# Altium PCB Commodore CPM Modul.PcbDoc (part 1 of 2)
Units mm, origin at the board's own origin, x right, y up, seen from the top; angles counter-clockwise.
Board outline 105.5 x 129.25 mm, 2 copper layers (Top Layer, Bottom Layer), stack 1.569 mm thick; 51 components, 93 nets, 364 pads, 127 vias.
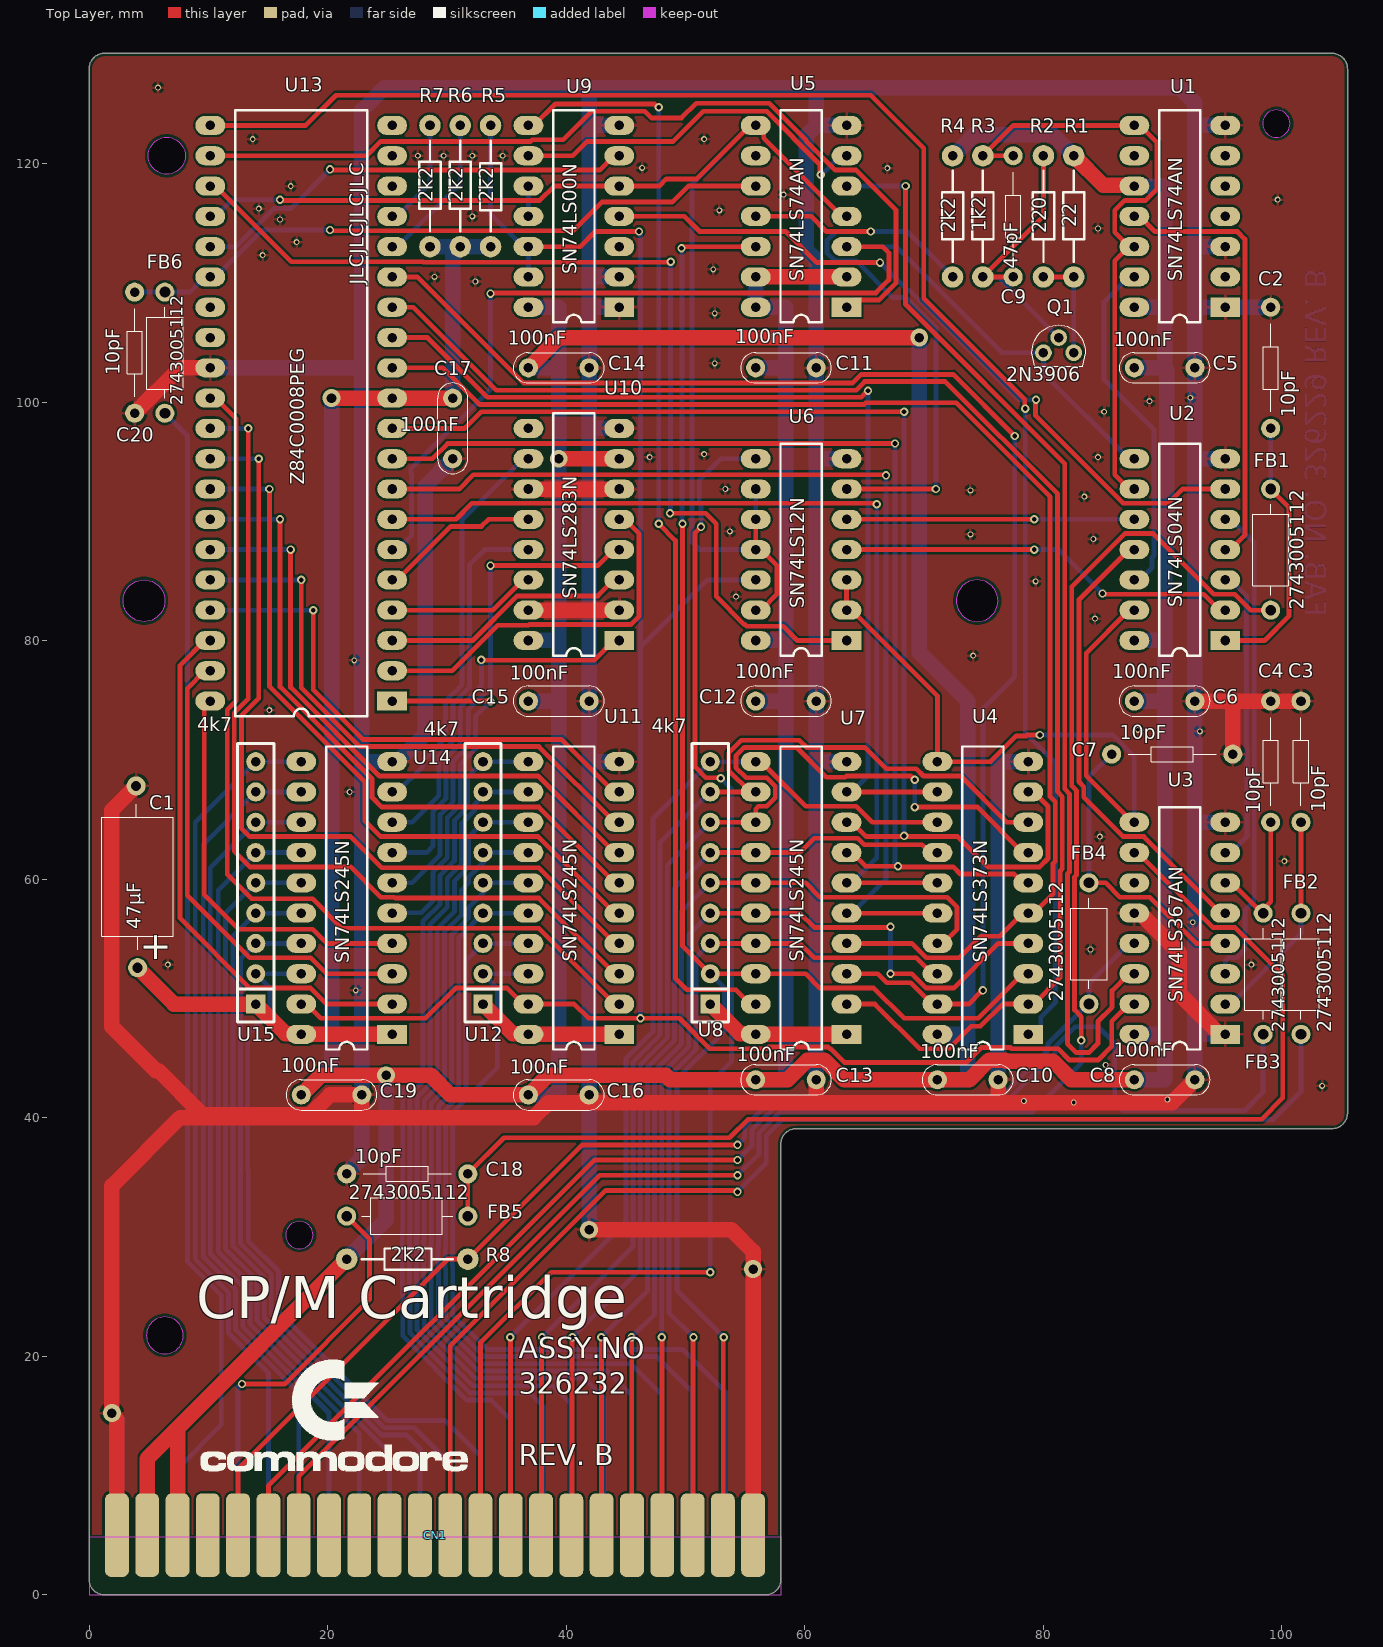
[diagram p0: Top Layer view]
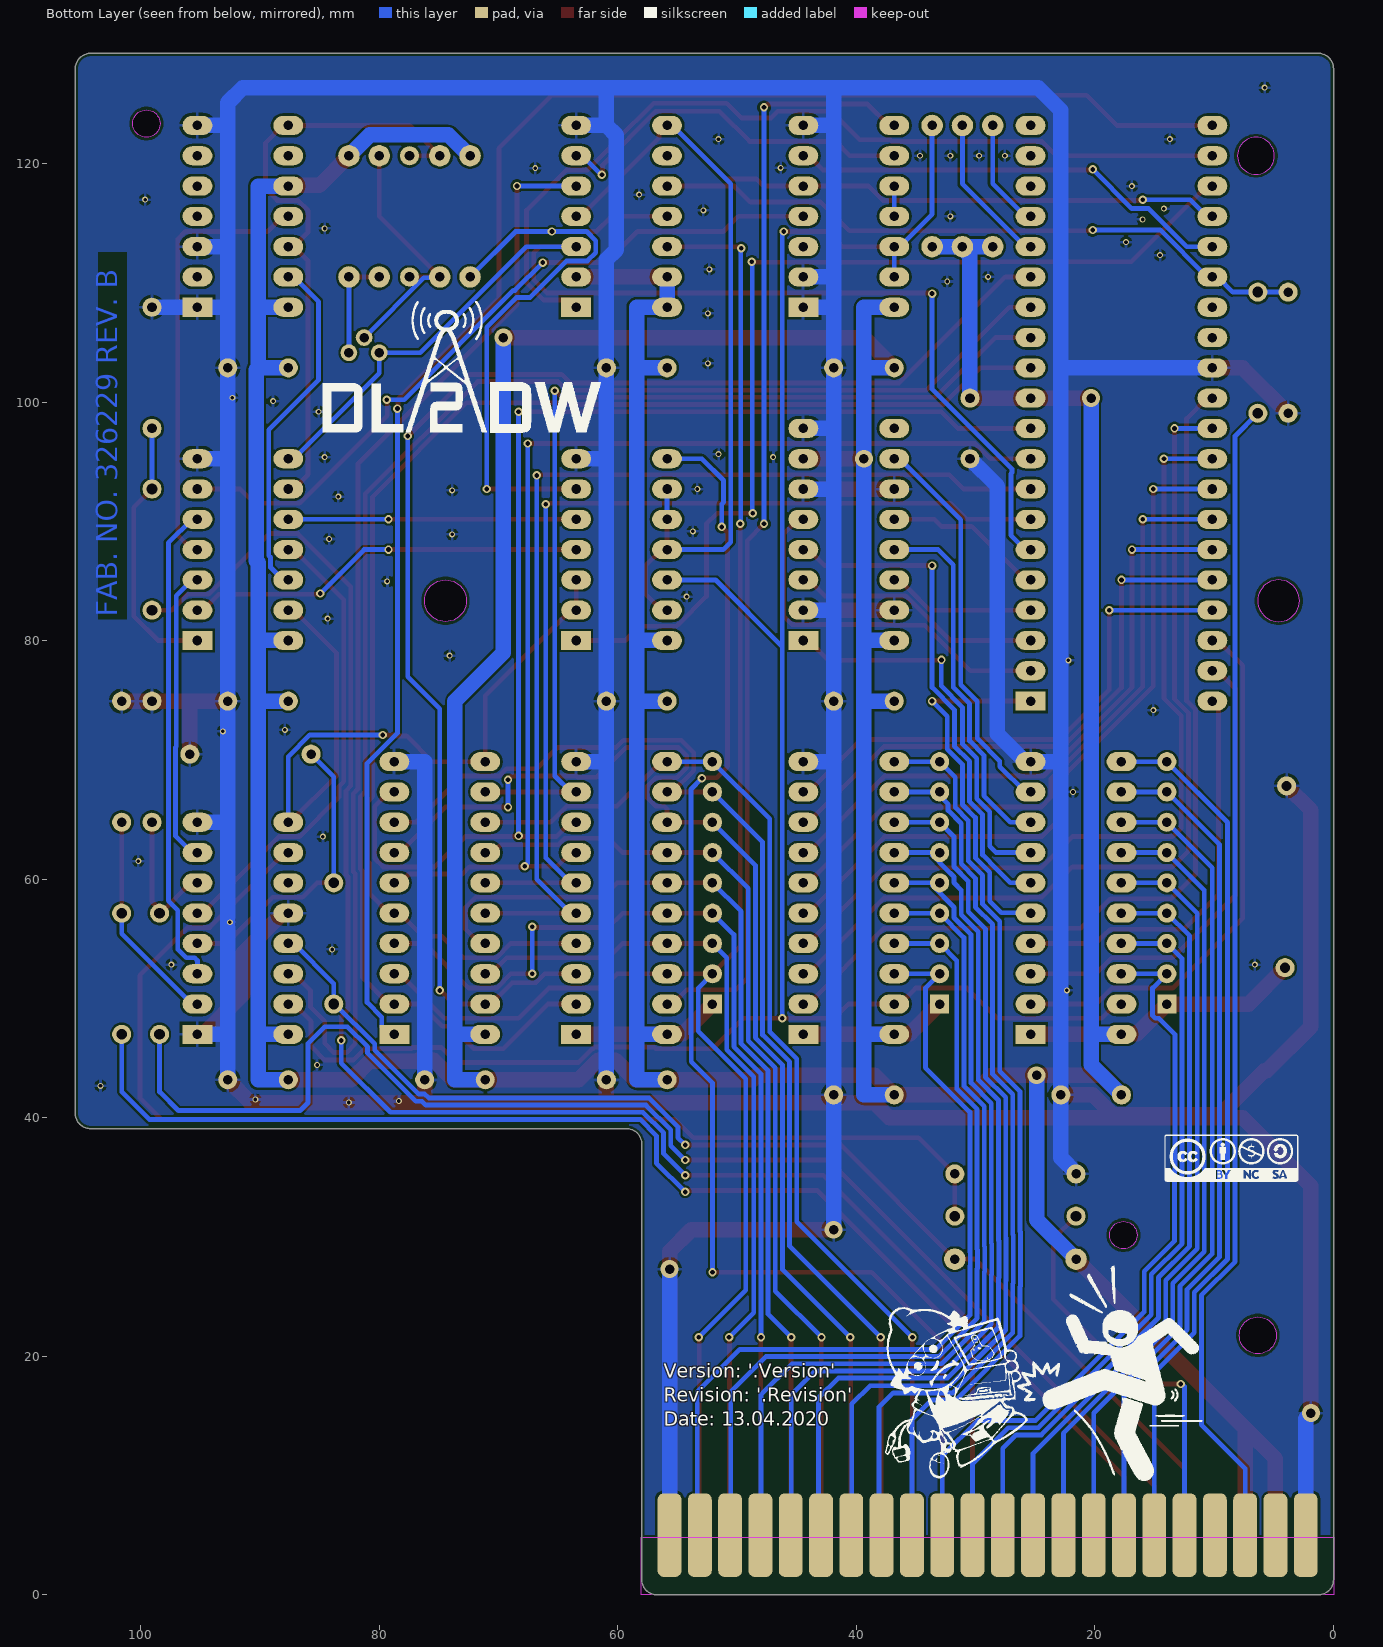
[diagram p1: Bottom Layer view, seen from below]
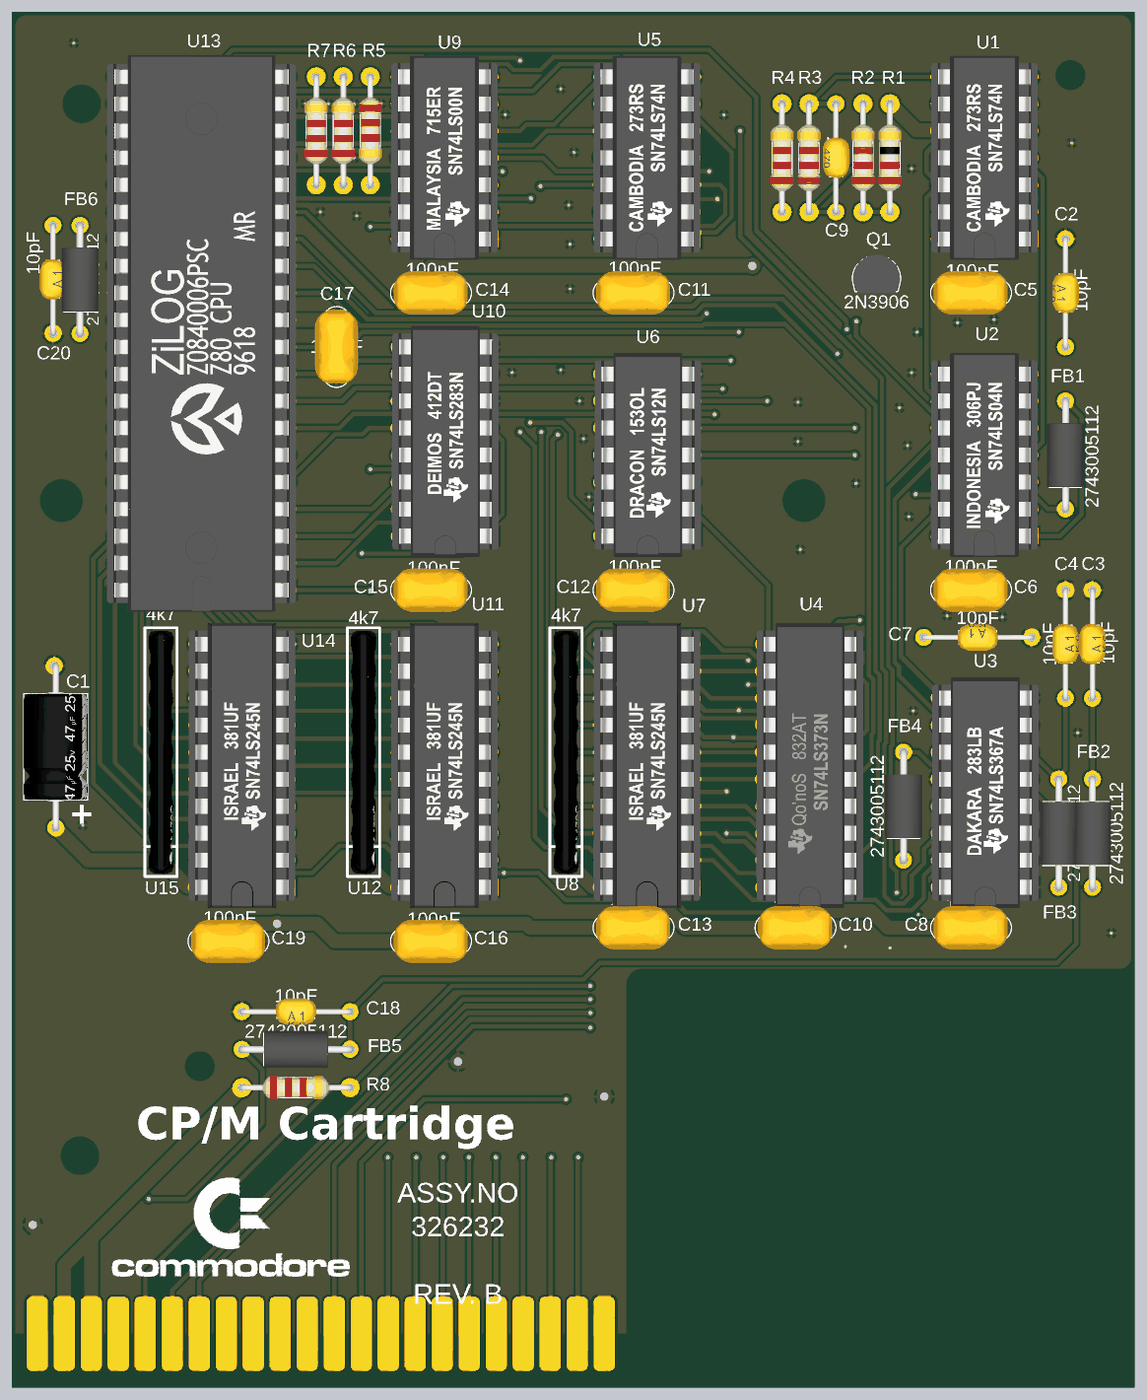
[diagram p3: 3D render of the assembled board from above, using the file's embedded part models]

## Layer stack, top to bottom
Top Solder: solder mask 0.0254, SM-001, Dk 4
Top Layer: signal copper 0.035
Dielectric 1: core 1.4986, Core-043, Dk 4.3
Bottom Layer: signal copper 0.035
Bottom Solder: solder mask 0.0254, SM-001, Dk 4

## Board outline
0,1.27 ccw(c1.27,1.27) 1.27,0 56.728,0 ccw(c56.728,1.27) 57.998,1.27 57.998,37.809 cw(c59.269,37.809) 59.269,39.08 104.202,39.08 ccw(c104.202,40.378) 105.5,40.378 105.5,127.926 ccw(c104.176,127.926) 104.176,129.25 1.306,129.25 ccw(c1.306,127.944) 0,127.944
cut-out: 16.469,30.16 ccw(c17.619,30.16) 17.619,29.01 ccw(c17.619,30.16) 18.769,30.16 ccw(c17.619,30.16) 17.619,31.31 ccw(c17.619,30.16)
cut-out: 4.797,21.748 ccw(c6.347,21.748) 6.347,20.198 ccw(c6.347,21.748) 7.897,21.748 ccw(c6.347,21.748) 6.347,23.298 ccw(c6.347,21.748)
cut-out: 6.506,119.1 cw(c6.506,120.65) 4.956,120.65 cw(c6.506,120.65) 6.506,122.2 cw(c6.506,120.65) 8.056,120.65 cw(c6.506,120.65)
cut-out: 98.38,123.349 ccw(c99.53,123.349) 99.53,122.199 ccw(c99.53,123.349) 100.68,123.349 ccw(c99.53,123.349) 99.53,124.499 ccw(c99.53,123.349)
cut-out: 4.601,81.594 cw(c4.601,83.344) 2.851,83.344 cw(c4.601,83.344) 4.601,85.094 cw(c4.601,83.344) 6.351,83.344 cw(c4.601,83.344)
cut-out: 72.701,83.344 ccw(c74.451,83.344) 74.451,81.594 ccw(c74.451,83.344) 76.201,83.344 ccw(c74.451,83.344) 74.451,85.094 ccw(c74.451,83.344)

## Design rules (kind name [scope] priority, off if disabled: settings)
BoardOutlineClearance [All] p1: gap=0.254 ignorepadtopadclearanceinfootprint=FALSE except(0: Region-OutlineEdge)
Clearance [All] p1: gap=0.2 ignorepadtopadclearanceinfootprint=TRUE
ComponentClearance ComponentClearance_Sheet [HasFootprint('PCB Title Block DIN A4')] p1: gap=0 collisioncheckmode=3 verticalgap=0 showdistances=FALSE
ComponentClearance [All] p2: gap=0 collisioncheckmode=3 verticalgap=0 showdistances=FALSE
MinimumSolderMaskSliver [All] p1: minsoldermaskwidth=0.103
PolygonConnect [All] p1: connectstyle=Relief reliefconductorwidth=0.254 reliefentries=4 polygonreliefangle="90 Angle" airgapwidth=0.254
RoutingVias RoutingVias_Power [(InNet('VCC') OR InNet('GND') OR InNet('+5V'))] p1: holewidth=0.8 width=1.5 viastyle="Through Hole" minholewidth=0.5 minwidth=1 maxholewidth=0.8 maxwidth=1.5
RoutingVias [All] p2: holewidth=0.4 width=0.7 viastyle="Through Hole" minholewidth=0.3 minwidth=0.6 maxholewidth=0.5 maxwidth=0.8
SilkToSilkClearance [All] p1: silktosilkclearance=0
SilkToSolderMaskClearance [IsPad] p1: minsilkscreentomaskgap=0.2 clearancetoexposedcopper=TRUE
SolderMaskExpansion [All] p1: expansion=0.038 istentingtop=FALSE
UnRoutedNet [All] p1: checkbadconnections=TRUE
Width Width_Power [(InNet('VCC') OR InNet('GND') OR InNet('+5V'))] p1: maxlimit=1.5 minlimit=1 preferedwidth=1.3
Width [All] p2: maxlimit=0.6 minlimit=0.3 preferedwidth=0.4
25 further rules are at their usual default settings.

## Classes and differential pairs
net class L_D[0..7]: L_D0 L_D1 L_D2 L_D3 L_D4 L_D5 L_D6 L_D7
net class L_A[0..15]: L_A0 L_A1 L_A2 L_A3 L_A4 L_A5 L_A6 L_A7 L_A8 L_A9 L_A10 L_A11 L_A12 L_A13 L_A14 L_A15
net class D[0..7]: D0 D1 D2 D3 D4 D5 D6 D7
net class A[0..15]: A0 A1 A2 A3 A4 A5 A6 A7 A8 A9 A10 A11 A12 A13 A14 A15

## Components (designator, comment, footprint, x,y, rotation, side; value= is the part's Value field where it differs from the comment)
C1 "47µF" "CAP Elec 47uF 25V Axial - Vishay MAL203036479E3" 4.064,52.578 r90 top
C2 "10pF" "CAP CER 10PF 50V C0G/NP0 AXIAL Vishay A100J15C0GF5TAA" 99.06,107.95 r270 top locked
C3 "10pF" "CAP CER 10PF 50V C0G/NP0 AXIAL Vishay A100J15C0GF5TAA" 101.6,64.77 r90 top locked
C4 "10pF" "CAP CER 10PF 50V C0G/NP0 AXIAL Vishay A100J15C0GF5TAA" 99.06,64.77 r90 top locked
C5 "100nF" "CAP CER 0.1UF 50V X7R RADIAL Kemet C330C104J5R5TA" 92.71,102.87 r180 top locked
C6 "100nF" "CAP CER 0.1UF 50V X7R RADIAL Kemet C330C104J5R5TA" 92.71,74.93 r180 top locked
C7 "10pF" "CAP CER 10PF 50V C0G/NP0 AXIAL Vishay A100J15C0GF5TAA" 95.885,70.485 r180 top locked
C8 "100nF" "CAP CER 0.1UF 50V X7R RADIAL Kemet C330C104J5R5TA" 92.71,43.18 r180 top locked
C9 "47pF" "CAP CER 47PF 50V C0G/NP0 AXIAL Vishay A470J15C0GF5TAA" 77.47,120.65 r270 top locked
C10 "100nF" "CAP CER 0.1UF 50V X7R RADIAL Kemet C330C104J5R5TA" 76.2,43.18 r180 top locked
C11 "100nF" "CAP CER 0.1UF 50V X7R RADIAL Kemet C330C104J5R5TA" 60.96,102.87 r180 top locked
C12 "100nF" "CAP CER 0.1UF 50V X7R RADIAL Kemet C330C104J5R5TA" 60.96,74.93 r180 top locked
C13 "100nF" "CAP CER 0.1UF 50V X7R RADIAL Kemet C330C104J5R5TA" 60.96,43.18 r180 top locked
C14 "100nF" "CAP CER 0.1UF 50V X7R RADIAL Kemet C330C104J5R5TA" 41.91,102.87 r180 top locked
C15 "100nF" "CAP CER 0.1UF 50V X7R RADIAL Kemet C330C104J5R5TA" 41.91,74.93 r180 top locked
C16 "100nF" "CAP CER 0.1UF 50V X7R RADIAL Kemet C330C104J5R5TA" 41.91,41.91 r180 top locked
C17 "100nF" "CAP CER 0.1UF 50V X7R RADIAL Kemet C330C104J5R5TA" 30.48,95.25 r90 top locked
C18 "10pF" "CAP CER 10PF 50V C0G/NP0 AXIAL Vishay A100J15C0GF5TAA" 21.59,35.288 r0 top locked
C19 "100nF" "CAP CER 0.1UF 50V X7R RADIAL Kemet C330C104J5R5TA" 22.86,41.91 r180 top locked
C20 "10pF" "CAP CER 10PF 50V C0G/NP0 AXIAL Vishay A100J15C0GF5TAA" 3.81,99.06 r90 top locked
CN1 "Expansion Port EDGE Connector" "C64 Expansion Port EDGE Connector" 2.329,5 r0 top locked
FB1 "2743005112" "Ferrite Bead Fair Rite 2743005112 axial 10,16mm" 99.06,82.55 r90 top locked
FB2 "2743005112" "Ferrite Bead Fair Rite 2743005112 axial 10,16mm" 101.6,46.99 r90 top locked
FB3 "2743005112" "Ferrite Bead Fair Rite 2743005112 axial 10,16mm" 98.425,46.99 r90 top locked
FB4 "2743005112" "Ferrite Bead Fair Rite 2743005112 axial 10,16mm" 83.82,49.53 r90 top locked
FB5 "2743005112" "Ferrite Bead Fair Rite 2743005112 axial 10,16mm" 21.59,31.75 r0 top locked
FB6 "2743005112" "Ferrite Bead Fair Rite 2743005112 axial 10,16mm" 6.35,99.06 r90 top locked
Q1 "2N3906" 2N3906 80.01,104.14 r0 top locked
R1 "22" "22 Ohm R Axial DIN0207 L6.3mm D2.5mm P10.16mm Horizontal" 82.55,110.49 r90 top locked
R2 "220" "220 Ohm R Axial DIN0207 L6.3mm D2.5mm P10.16mm Horizontal" 80.01,110.49 r90 top locked
R3 "1k2" "1,2 kOhm R Axial DIN0207 L6.3mm D2.5mm P10.16mm Horizontal" 74.93,110.49 r90 top locked
R4 "2k2" "2,2 kOhm R Axial DIN0207 L6.3mm D2.5mm P10.16mm Horizontal" 72.39,110.49 r90 top locked
R5 "2k2" "2,2 kOhm R Axial DIN0207 L6.3mm D2.5mm P10.16mm Horizontal" 33.655,123.19 r270 top locked
R6 "2k2" "2,2 kOhm R Axial DIN0207 L6.3mm D2.5mm P10.16mm Horizontal" 31.115,113.03 r90 top locked
R7 "2k2" "2,2 kOhm R Axial DIN0207 L6.3mm D2.5mm P10.16mm Horizontal" 28.575,113.03 r90 top locked
R8 "2k2" "2,2 kOhm R Axial DIN0207 L6.3mm D2.5mm P10.16mm Horizontal" 21.59,28.144 r0 top locked
U1 "SN74LS74AN" "SN74LS74N with Socket" 95.25,107.95 r180 top locked
U2 "SN74LS04N" "SN74LS04N with Socket" 95.25,80.01 r90 top locked
U3 "SN74LS367AN" "SN74LS367A with Socket" 95.25,46.99 r180 top locked
U4 "SN74LS373N" "SN74LS373N with Socket" 78.74,46.99 r180 top locked
U5 "SN74LS74AN" "SN74LS74N with Socket" 63.5,107.95 r180 top locked
U6 "SN74LS12N" "SN74LS12N with Socket" 63.5,80.01 r180 top locked
U7 "SN74LS245N" "SN74LS245N with Socket" 63.5,46.99 r180 top locked
U8 "4k7" "4k7 x8 Resistor Array SIL Royal 9A472G" 52.07,49.53 r90 top locked
U9 "SN74LS00N" "SN74LS00N with Socket" 44.45,107.95 r90 top locked
U10 "SN74LS283N" "SN74LS283N with Socket" 44.45,80.01 r180 top locked
U11 "SN74LS245N" "SN74LS245N with Socket" 44.45,46.99 r180 top locked
U12 "4k7" "4k7 x8 Resistor Array SIL Royal 9A472G" 33.02,49.53 r90 top locked
U13 "Z84C0008PEG" "Zilog Z80 CPU with Socket" 25.4,74.93 r180 top locked
U14 "SN74LS245N" "SN74LS245N with Socket" 25.4,46.99 r180 top locked
U15 "4k7" "4k7 x8 Resistor Array SIL Royal 9A472G" 13.97,49.53 r90 top locked

## Footprints (in the part's own frame and the unit in brackets; to place one, negate y for a bottom-side part, rotate by r counter-clockwise, add the part's x,y. Pads: shape width x height; smd on the part's side, far side on the other; paste and mask are expansions set on the pad)
"1,2 kOhm R Axial DIN0207 L6.3mm D2.5mm P10.16mm Horizontal" [mm]
  round 1.8 hole 0.8: 1(0,0) 2(10.16,0)
  silkscreen extent 1.27,-0.89 8.89,0.89, body extent -0.27,-1.14 10.44,1.14, height 2.44
"2,2 kOhm R Axial DIN0207 L6.3mm D2.5mm P10.16mm Horizontal" [mm]
  round 1.8 hole 0.8: 1(0,0) 2(10.16,0)
  silkscreen extent 1.27,-0.89 8.89,0.89, body extent -0.27,-1.14 10.44,1.14, height 2.44
2N3906 [mm] "PNP General Purpose  Transistors"
  round 1.4 hole 0.8: 1(0,0) 2(1.27,1.27) 3(2.54,0)
  silkscreen extent -1.02,-1.14 3.56,2.29, body extent -0.97,-1.34 3.51,2.35, height 7.52
"4k7 x8 Resistor Array SIL Royal 9A472G" [mm]
  rect 1.6x1.6 hole 0.8: 1(0,0)
  round 1.6 hole 0.8: 2(2.54,0) 3(5.08,0) 4(7.62,0) 5(10.16,0) 6(12.7,0) 7(15.24,0) 8(17.78,0) 9(20.32,0)
  silkscreen extent -1.52,-1.52 21.84,1.52, body extent -1.27,-1.21 21.59,1.21, height 5.03
"22 Ohm R Axial DIN0207 L6.3mm D2.5mm P10.16mm Horizontal" [mm]
  round 1.8 hole 0.8: 1(0,0) 2(10.16,0)
  silkscreen extent 1.27,-0.89 8.89,0.89, body extent -0.27,-1.14 10.44,1.14, height 2.44
"220 Ohm R Axial DIN0207 L6.3mm D2.5mm P10.16mm Horizontal" [mm]
  round 1.8 hole 0.8: 1(0,0) 2(10.16,0)
  silkscreen extent 1.27,-0.89 8.89,0.89, body extent -0.27,-1.14 10.44,1.14, height 2.44
"C64 Expansion Port EDGE Connector" [mm] "C64 Expansion Port EDGE Connector"
  rrect50% 2x7 smd paste-1: 1(0,0) 2(2.54,0) 3(5.08,0) 4(7.62,0) 5(10.16,0) 6(12.7,0) 7(15.24,0) 8(17.78,0) 9(20.32,0) 10(22.86,0) 11(25.4,0) 12(27.94,0) 13(30.48,0) 14(33.02,0) 15(35.56,0) 16(38.1,0) 17(40.64,0) 18(43.18,0) 19(45.72,0) 20(48.26,0) 21(50.8,0) 22(53.34,0)
  rrect50% 2x7 smd far side paste-1: A(0,0) B(2.54,0) C(5.08,0) D(7.62,0) E(10.16,0) F(12.7,0) H(15.24,0) J(17.78,0) K(20.32,0) L(22.86,0) M(25.4,0) N(27.94,0) P(30.48,0) R(33.02,0) S(35.56,0) T(38.1,0) U(40.64,0) V(43.18,0) W(45.72,0) X(48.26,0) Y(50.8,0) Z(53.34,0)
"CAP CER 0.1UF 50V X7R RADIAL Kemet C330C104J5R5TA" [mm] "0,1µF ±5% 50V Keramikkondensatoren X7R Radial"
  round 1.6 hole 0.8: 1(0,0) 2(5.08,0)
  silkscreen extent -1.27,-1.27 6.35,1.27, body extent -0.91,-2.04 6.06,2.03, height 10.26
"CAP CER 10PF 50V C0G/NP0 AXIAL Vishay A100J15C0GF5TAA" [mm] "10pF ±5% 50V Keramikkondensatoren C0G, NP0 Axial"
  round 1.6 hole 0.8: 1(0,0) 2(10.16,0)
  silkscreen extent 1.4,-0.63 8.76,0.64, body extent -0.25,-1.25 10.41,1.25, height 2.55
"CAP CER 47PF 50V C0G/NP0 AXIAL Vishay A470J15C0GF5TAA" [mm] "47pF ±5% 50V Keramikkondensatoren C0G, NP0 Axial"
  round 1.6 hole 0.8: 1(0,0) 2(10.16,0)
  silkscreen extent 1.4,-0.63 8.76,0.64, body extent -0.25,-1.25 10.41,1.25, height 2.55
"CAP Elec 47uF 25V Axial - Vishay MAL203036479E3" [mm] "Aluminium Electrolytic Capacitors - Axial Leaded 47uF 25V -10%,+50% Axial"
  round 1.6 hole 0.85: 1(0,0) 2(15.24,0.127)
  silkscreen extent 1.52,-3 13.72,3, body extent -0.3,-3 15.54,3, height 6.1
"Ferrite Bead Fair Rite 2743005112 axial 10,16mm" [mm] "FERRITE BEAD AXIAL 1LN"
  round 1.6 hole 0.9: 1(0,0) 2(10.16,0)
  silkscreen extent 1.27,-1.52 8.89,1.52, body extent -0.33,-1.75 10.48,1.75, height 3.75
"SN74LS00N with Socket" [mm]
  rect 1.6x2.5 hole 0.8: 1(0,0)
  oval 1.6x2.5 hole 0.8: 2(2.54,0) 3(5.08,0) 4(7.62,0) 5(10.16,0) 6(12.7,0) 7(15.24,0) 8(15.24,7.62) 9(12.7,7.62) 10(10.16,7.62) 11(7.62,7.62) 12(5.08,7.62) 13(2.54,7.62) 14(0,7.62)
  silkscreen extent -1.27,2.08 16.51,5.54, body extent -1.97,-1.19 17.21,8.86, height 7.91
"SN74LS04N with Socket" [mm]
  rect 1.6x2.5 hole 0.8: 1(0,0)
  oval 1.6x2.5 hole 0.8: 2(2.54,0) 3(5.08,0) 4(7.62,0) 5(10.16,0) 6(12.7,0) 7(15.24,0) 8(15.24,7.62) 9(12.7,7.62) 10(10.16,7.62) 11(7.62,7.62) 12(5.08,7.62) 13(2.54,7.62) 14(0,7.62)
  silkscreen extent -1.27,2.08 16.51,5.54, body extent -1.97,-1.19 17.21,8.86, height 7.91
"SN74LS12N with Socket" [mm] "triple 3-input NAND gate"
  rect 2.5x1.6 hole 0.8: 1(0,0)
  oval 2.5x1.6 hole 0.8: 2(0,-2.54) 3(0,-5.08) 4(0,-7.62) 5(0,-10.16) 6(0,-12.7) 7(0,-15.24) 8(7.62,-15.24) 9(7.62,-12.7) 10(7.62,-10.16) 11(7.62,-7.62) 12(7.62,-5.08) 13(7.62,-2.54) 14(7.62,0)
  silkscreen extent 2.08,-16.51 5.54,1.27, body extent -1.27,-17.21 8.78,1.97, height 8.01
"SN74LS74N with Socket" [mm]
  rect 2.5x1.6 hole 0.8: 1(0,0)
  oval 2.5x1.6 hole 0.8: 2(0,-2.54) 3(0,-5.08) 4(0,-7.62) 5(0,-10.16) 6(0,-12.7) 7(0,-15.24) 8(7.62,-15.24) 9(7.62,-12.7) 10(7.62,-10.16) 11(7.62,-7.62) 12(7.62,-5.08) 13(7.62,-2.54) 14(7.62,0)
  silkscreen extent 2.08,-16.51 5.54,1.27, body extent -1.19,-17.21 8.86,1.97, height 7.91
"SN74LS245N with Socket" [mm]
  rect 2.5x1.6 hole 0.8: 1(0,0)
  oval 2.5x1.6 hole 0.8: 2(0,-2.54) 3(0,-5.08) 4(0,-7.62) 5(0,-10.16) 6(0,-12.7) 7(0,-15.24) 8(0,-17.78) 9(0,-20.32) 10(0,-22.86) 11(7.62,-22.86) 12(7.62,-20.32) 13(7.62,-17.78) 14(7.62,-15.24) 15(7.62,-12.7) 16(7.62,-10.16) 17(7.62,-7.62) 18(7.62,-5.08) 19(7.62,-2.54) 20(7.62,0)
  silkscreen extent 2.08,-24.13 5.54,1.27, body extent -1.19,-24.83 8.86,1.97, height 7.91
"SN74LS283N with Socket" [mm] "4-bit binary full adder (has carry in function)"
  rect 2.5x1.6 hole 0.8: 1(0,0)
  oval 2.5x1.6 hole 0.8: 2(0,-2.54) 3(0,-5.08) 4(0,-7.62) 5(0,-10.16) 6(0,-12.7) 7(0,-15.24) 8(0,-17.78) 9(7.62,-17.78) 10(7.62,-15.24) 11(7.62,-12.7) 12(7.62,-10.16) 13(7.62,-7.62) 14(7.62,-5.08) 15(7.62,-2.54) 16(7.62,0)
  silkscreen extent 2.08,-19.05 5.54,1.27, body extent -1.27,-19.75 8.78,1.97, height 8.01
"SN74LS367A with Socket" [mm] "hex buffer, non-inverting outputs"
  rect 2.5x1.6 hole 0.8: 1(0,0)
  oval 2.5x1.6 hole 0.8: 2(0,-2.54) 3(0,-5.08) 4(0,-7.62) 5(0,-10.16) 6(0,-12.7) 7(0,-15.24) 8(0,-17.78) 9(7.62,-17.78) 10(7.62,-15.24) 11(7.62,-12.7) 12(7.62,-10.16) 13(7.62,-7.62) 14(7.62,-5.08) 15(7.62,-2.54) 16(7.62,0)
  silkscreen extent 2.08,-19.05 5.54,1.27, body extent -1.27,-19.75 8.78,1.97, height 8.01
"SN74LS373N with Socket" [mm] "OCTAL D-TYPE TRANSPARENT LATCHES AND EDGE-TRIGGERED FLIP-FLOPS"
  rect 2.5x1.6 hole 0.8: 1(0,0)
  oval 2.5x1.6 hole 0.8: 2(0,-2.54) 3(0,-5.08) 4(0,-7.62) 5(0,-10.16) 6(0,-12.7) 7(0,-15.24) 8(0,-17.78) 9(0,-20.32) 10(0,-22.86) 11(7.62,-22.86) 12(7.62,-20.32) 13(7.62,-17.78) 14(7.62,-15.24) 15(7.62,-12.7) 16(7.62,-10.16) 17(7.62,-7.62) 18(7.62,-5.08) 19(7.62,-2.54) 20(7.62,0)
  silkscreen extent 2.08,-24.13 5.54,1.27, body extent -1.27,-24.83 8.78,1.97, height 8.01
"Zilog Z80 CPU with Socket" [mm]
  rect 2.5x1.6 hole 0.8: 1(0,0)
  oval 2.5x1.6 hole 0.8: 2(0,-2.54) 3(0,-5.08) 4(0,-7.62) 5(0,-10.16) 6(0,-12.7) 7(0,-15.24) 8(0,-17.78) 9(0,-20.32) 10(0,-22.86) 11(0,-25.4) 12(0,-27.94) 13(0,-30.48) 14(0,-33.02) 15(0,-35.56) 16(0,-38.1) 17(0,-40.64) 18(0,-43.18) 19(0,-45.72) 20(0,-48.26) 21(15.24,-48.26) 22(15.24,-45.72) 23(15.24,-43.18) 24(15.24,-40.64) 25(15.24,-38.1) 26(15.24,-35.56) 27(15.24,-33.02) 28(15.24,-30.48) 29(15.24,-27.94) 30(15.24,-25.4) 31(15.24,-22.86) 32(15.24,-20.32) 33(15.24,-17.78) 34(15.24,-15.24) 35(15.24,-12.7) 36(15.24,-10.16) 37(15.24,-7.62) 38(15.24,-5.08) 39(15.24,-2.54) 40(15.24,0)
  silkscreen extent 2.08,-49.53 13.16,1.27, body extent -1.27,-50.3 16.51,2.04, height 8.89

## Part data
C1: library part CMP-Capacitors-Electrolyt_Capacitors00023-1, "Cap Aluminum 47uF 25V -10% to 50% (6 X 10mm) Axial 4.8 Ohm 100mA 3000 hr 85C Taped in Box", Capacitance=47uF, Case/Package=Axial, ESR (Equivalent Series Resistance)=4.8R, Leakage Current=12uA, Max Operating Temperature=85°C, Min Operating Temperature=-40°C, Package Quantity=1000, Ripple Current=100mA, Tolerance=50%, Voltage=25V, Construction=AXIAL, Diameter=6mm, Height=10mm, Impedance=1.9R, Lead Diameter=0.6mm, Lead Pitch=15mm, Length=10mm, Life (Hours)=3000Hour, Mount="Through Hole", Packaging="Tape and Reel", Polarity=Polar, Radiation Hardening=No, REACH SVHC=Unknown, RoHS Compliant=Yes, Series="030 AS", Termination=Axial, Voltage Rating=25V, Voltage Rating (DC)=25V
C2 C3 C4 C7 C18 C20: library part CMP-Capacitors-Ceramic_Capacitors-00047-1, "Cap Ceramic 10pF 50V C0G 5% Axial 125C T/R", Case/Package=Axial, Dielectric=C0G, Max Operating Temperature=125°C, Min Operating Temperature=-55°C, Package Quantity=7000, Tolerance=5%, Voltage Rating=50V, Capacitance=10pF, Construction=AXIAL, Length=0.15inch, Mount="Through Hole", Packaging="Tape and Reel", Radiation Hardening=No, RoHS Compliant=Yes, Series=A, Termination=Axial
C5 C6 C8 C10 C11 C12 C13 C14 C15 C16 C17 C19: library part CMP-Capacitors-Ceramic_Capacitors-00046-1, "Cap Ceramic 0.1uF 50V X7R 5% Radial 5.08mm 125C Bulk", Case/Package=Dipped, Dielectric=X7R, Max Operating Temperature=125°C, Min Operating Temperature=-55°C, Tolerance=5%, Capacitance=100nF, Construction=RADIAL, Depth=3.81mm, Lead Pitch=5.08mm, Length=7.62mm, Mount="Through Hole", Packaging=Bulk, Radiation Hardening=No, RoHS Compliant=Yes, Termination=Radial
C9: library part CMP-Capacitors-Ceramic_Capacitors-00048-1, "Cap Ceramic 47pF 50V C0G 5% Axial 125C T/R", Case/Package=Axial, Dielectric=C0G, Max Operating Temperature=125°C, Min Operating Temperature=-55°C, Package Quantity=7000, Tolerance=5%, Voltage Rating=50V, Capacitance=47pF, Construction=AXIAL, Length=0.15inch, Mount="Through Hole", Packaging="Tape and Reel", Radiation Hardening=No, RoHS Compliant=Yes, Series=A, Termination=Axial
CN1: library part CMP-Commodore-00008-4, "Expansion Port EDGE Connector for Interface Cards"
FB1 FB2 FB3 FB4 FB5 FB6: library part CMP-Inductors-00000-10, "Ferrite Beads Axial 91Ohm 100MHz T/R", Case/Package=Axial, Max Operating Temperature=125°C, Min Operating Temperature=-55°C, Package Quantity=4500, Test Frequency=100MHz, Diameter=3.5mm, Impedance=91R, Length=6mm, Packaging="Tape and Reel", Shielding=Unshielded, Termination=Axial
Q1: library part CMP-Transistors-00014-1, "Bipolar Transistor PNP Amplifier/Switch 40V 200mA 3-Pin TO-92 Through Hole Box", Case/Package=TO-92, Collector Base Voltage (VCBO)=40V, Collector Emitter Saturation Voltage=400mV, Continuous Collector Current=200mA, Emitter Base Voltage (VEBO)=5V, Max Collector Current=50nA, Max Power Dissipation=625mW, Package Quantity=2500, Transition Frequency=250MHz, Collector Emitter Breakdown Voltage=40V, Collector Emitter Voltage (VCEO)=40V, Collector-emitter Voltage-Max=40V, Element Configuration=Single, Gain Bandwidth Product=250MHz, hFE Min=100, Lead Free="Lead Free", Mount="Through Hole", Packaging=Bulk, Polarity=PNP, RoHS Compliant=Yes, Series=-
R1: library part CMP-Resistors-Yageo_THT_DIN_0207-00032-1, "RES 22 OHM 1/4W 5% AXIAL", Case/Package=Axial, Max Operating Temperature=155°C, Max Power Dissipation=250mW, Min Operating Temperature=-55°C, Package Quantity=200, Resistance=22R, Temperature Coefficient=500ppm/°C, Tolerance=5%, Composition="Carbon Film", Length=0.248inch, Number of Terminations=2, Packaging=Bulk
R2: library part CMP-Resistors-Yageo_THT_DIN_0207-00056-1, "RES 220 OHM 1/4W 5% AXIAL", Case/Package=Axial, Max Operating Temperature=155°C, Max Power Dissipation=250mW, Min Operating Temperature=-55°C, Package Quantity=200, Resistance=220R, Temperature Coefficient=500ppm/°C, Tolerance=5%, Composition="Carbon Film", Length=0.248inch, Number of Terminations=2, Packaging=Bulk
R3: library part CMP-Resistors-Yageo_THT_DIN_0207-00074-1, "RES 1.2K OHM 1/4W 5% AXIAL", Case/Package=Axial, Max Operating Temperature=155°C, Max Power Dissipation=250mW, Min Operating Temperature=-55°C, Package Quantity=200, Resistance=1.2kR, Temperature Coefficient=500ppm/°C, Tolerance=5%, Composition="Carbon Film", Lead Free="Lead Free", Length=0.248inch, Number of Terminations=2, Packaging=Bulk
R4 R5 R6 R7 R8: library part CMP-Resistors-Yageo_THT_DIN_0207-00080-1, "RES 2.2K OHM 1/4W 5% AXIAL", Case/Package=Axial, Max Operating Temperature=155°C, Max Power Dissipation=250mW, Min Operating Temperature=-55°C, Package Quantity=200, Resistance=2.2kR, Temperature Coefficient=500ppm/°C, Tolerance=5%, Composition="Carbon Film", Lead Free="Lead Free", Length=0.248inch, Mount="Through Hole", Number of Terminations=2, Packaging=Bulk
U1 U5: library part CMP-ICs-74xx-series-00042-2, "TEXAS INSTRUMENTS   SN74LS74AN   Flip-Flop, with Set and Reset, Complementary Output, Differential, Positive Edge, D, 13 ns, 33 MHz", Case/Package=PDIP, Frequency=33MHz, High Level Output Current=-400uA, Low Level Output Current=8mA, Max Operating Temperature=70°C, Max Supply Voltage=5.25V, Min Operating Temperature=0°C, Min Supply Voltage=4.75V, Nominal Supply Current=25mA, Operating Supply Voltage=5V, Output Current=16mA, Package Quantity=25, Clock Edge Trigger Type="Positive Edge", Contact Plating=Gold, Height=4.57mm, Lead Free="Lead Free", Length=19.3mm, Logic Function=AND,D-Type,Flip-Flop,Latch, Max Frequency=33MHz, Mount="Through Hole", Number of Bits=2, Number of Bits per Element=1, Number of Channels=2, Number of Circuits=2, Number of Elements=2, Number of Input Lines=3, Number of Output Lines=1, Number of Pins=14, Output Type=TTL, Packaging=Rail/Tube, Polarity=Non-Inverting, Propagation Delay=40ns, Radiation Hardening=No, REACH SVHC="No SVHC", Turn-On Delay Time=13ns, Weight=0.032734oz, Width=6.35mm
U2: library part CMP-ICs-74xx-series-00006-2, "IC HEX INVERTER 14-DIP", Case/Package=PDIP, High Level Output Current=-400uA, Low Level Output Current=8mA, Max Operating Temperature=70°C, Max Supply Voltage=5.25V, Min Operating Temperature=0°C, Min Supply Voltage=4.75V, Nominal Supply Current=100uA, Operating Supply Voltage=5V, Package Quantity=25, Contact Plating=Gold, Height=4.57mm, Lead Free="Lead Free", Length=19.3mm, Logic Function=Buffer,Inverter, Max Output Current=8mA, Mount="Through Hole", Number of Bits=6, Number of Circuits=6, Number of Elements=6, Number of Gates=6, Number of Inputs=1, Number of Output Lines=6, Number of Pins=14, Output Current=8mA, Packaging=Rail/Tube, Propagation Delay=15ns, Radiation Hardening=No, REACH SVHC="No SVHC", Schmitt Trigger Input=No, Termination="Through Hole", Turn-On Delay Time=22ns, Weight=0.032734oz, Width=6.35mm
U3: library part CMP-ICs-74xx-series-00077-1, "I.C. SN74LS 367 AN", Case/Package=PDIP, High Level Output Current=-2.6mA, Low Level Output Current=24mA, Max Operating Temperature=70°C, Max Supply Voltage=5.25V, Min Operating Temperature=0°C, Min Supply Voltage=4.75V, Nominal Supply Current=100uA, Operating Supply Voltage=5V, Quiescent Current=12mA, Height=4.57mm, Lead Free="Lead Free", Length=19.3mm, Logic Function=Buffer, Mount="Through Hole", Number of Bits=6, Number of Channels=6, Number of Circuits=6, Number of Elements=2, Number of Inputs=6, Number of Outputs=6, Number of Pins=16, Output Current=24mA, Output Type=3-STATE, Packaging=Box, Polarity=Non-Inverting, Propagation Delay=40ns, REACH SVHC="No SVHC", RoHS Compliant=No, Technology=BIPOLAR, Width=6.35mm
U4: library part CMP-ICs-74xx-series-00062-1, "Latch Transparent 3-ST 8-CH D-Type 20-Pin PDIP Tube", Case/Package=PDIP, High Level Output Current=-2.6mA, Low Level Output Current=24mA, Max Operating Temperature=70°C, Max Supply Voltage=5.25V, Min Operating Temperature=0°C, Min Supply Voltage=4.75V, Operating Supply Current=40mA, Operating Supply Voltage=5V, Package Quantity=20, Contact Plating=Gold, Height=4.57mm, Independent Circuits=1, Lead Free="Lead Free", Length=24.33mm, Logic Function=D-Type,Latch,Flip-Flop, Mount="Through Hole", Number of Bits=8, Number of Channels=8, Number of Circuits=8, Number of Elements=1, Number of Input Lines=3, Number of Output Lines=1, Number of Outputs=8, Number of Pins=20, Output Current=24mA, Packaging=Rail/Tube, Polarity=Non-Inverting, Propagation Delay=18ns, Quiescent Current=24mA, Radiation Hardening=No, REACH SVHC="No SVHC", Turn-On Delay Time=12ns, Weight=0.042297oz, Width=6.35mm
U6: library part CMP-ICs-74xx-series-00012-2, "Logic Gates Triple 3-input Positive-NAND gates with open collector outputs 14-PDIP 0 to 70", Case/Package=PDIP, Lead Free="Contains Lead", Logic Function=NAND
U7 U11 U14: library part CMP-ICs-74xx-series-00046-2, "IC TXRX NON-INVERT 5.25V 20DIP", Case/Package=PDIP, High Level Output Current=-15mA, Low Level Output Current=24mA, Max Operating Temperature=70°C, Max Supply Voltage=5.25V, Min Operating Temperature=0°C, Min Supply Voltage=4.75V, Operating Supply Voltage=5V, Package Quantity=20, Quiescent Current=62mA, Contact Plating=Gold, Direction=Bidirectional, Height=4.57mm, Lead Free="Lead Free", Length=24.33mm, Logic Function=Transceiver,Inverting, Mount="Through Hole", Number of Bits=8, Number of Bits per Element=8, Number of Channels=8, Number of Circuits=8, Number of Elements=1, Number of Outputs=8, Number of Pins=20, Number of Transceivers=8, Packaging=Rail/Tube, Polarity=Non-Inverting, Propagation Delay=12ns, Radiation Hardening=No, REACH SVHC="No SVHC", Termination="Through Hole", Turn-On Delay Time=12ns, Weight=0.042297oz, Width=6.35mm
U8 U12 U15: library part CMP-Resistors-Resistor_Array00016-1, "Resistor Networks & Arrays 9pin 4.7Kohms 2% Bussed", Case/Package=SIP, Max Operating Temperature=125°C, Min Operating Temperature=-55°C, Number of Resistors=8, Package Quantity=1000, Power Per Element=200mW, Power Rating=1.12W, Resistance=4.7kR, Resistance Tolerance=2%, Temperature Coefficient=100ppm/°C, Voltage Rating=100V, Circuit Type=Bussed, Contact Plating=Tin,Lead, Depth=2.49mm, Height=0.195inch, Lead Free="Contains Lead", Lead Pitch=2.54mm, Length=22.61mm, Military Standard=Not, Mount="Through Hole", Number of Contacts=9, Number of Elements=10, Number of Pins=9, Number of Terminals=10, Number of Terminals/Pins=9, Packaging=Bulk, Radiation Hardening=No, REACH SVHC=Unknown, RoHS Compliant=No, Series=CSC, Technology="THICK FILM", Terminal Pitch=2.54mm, Termination=Pin, Thickness=2.49mm, Tolerance=2%, Voltage Rating (DC)=100V, Width=0.098inch, Working Voltage=100V
U9: library part CMP-ICs-74xx-series-00000-3, "IC, 74LS, 74LS00, DIP14, 5.25V", Case/Package=PDIP, High Level Output Current=-400uA, Low Level Output Current=8mA, Max Operating Temperature=70°C, Max Supply Voltage=5.25V, Min Operating Temperature=0°C, Min Supply Voltage=4.75V, Operating Supply Voltage=5V, Output Current=16mA, Package Quantity=25, Quiescent Current=2.4mA, Contact Plating=Gold, Height=4.57mm, Lead Free="Lead Free", Length=19.3mm, Logic Function=NAND, Mount="Through Hole", Number of Bits=4, Number of Circuits=4, Number of Elements=4, Number of Gates=4, Number of Input Lines=2, Number of Inputs=2, Number of Output Lines=1, Number of Outputs=1, Number of Pins=14, Packaging=Rail/Tube, Propagation Delay=15ns, Radiation Hardening=No, REACH SVHC="No SVHC", Schmitt Trigger Input=No, Turn-On Delay Time=15ns, Weight=0.032734oz, Width=6.35mm
U10: library part CMP-ICs-74xx-series-00079-1, "Binary Full Adder Single 4-Bit 16-Pin PDIP Box", Case/Package=PDIP, High Level Output Current=-400uA, Low Level Output Current=8mA, Max Operating Temperature=70°C, Max Supply Voltage=5.25V, Min Operating Temperature=0°C, Min Supply Voltage=4.75V, Operating Supply Voltage=5V, Lead Free="Lead Free", Logic Function="Binary Full Adder", Mount="Through Hole", Number of Bits=4, Number of Pins=16, Packaging=Box, REACH SVHC="No SVHC", RoHS Compliant=No
U13: library part CMP-ICs-00009-1, "IC MPU Z80 8MHZ 40DIP", Case/Package=DIP, Frequency=8MHz, Max Operating Temperature=100°C, Max Supply Voltage=5V, Min Operating Temperature=-40°C, Min Supply Voltage=4.5V, Package Quantity=10, Core Architecture=Z8, Data Bus Width=8b, Height=4.19mm, Lead Free="Lead Free", Length=62.74mm, Max Frequency=8MHz, Memory Size=64KB, Memory Type=ROMless, Mount="Through Hole", Number of I/Os=24, Number of Pins=40, Packaging=Rail/Tube, Radiation Hardening=No, REACH SVHC=Unknown, Voltage=5V, Width=14.22mm

## Via types
v1: diameter 0.7, hole 0.4, Top Layer to Bottom Layer, tented both sides, 63 vias
v2: diameter 0.5, hole 0.3, Top Layer to Bottom Layer, tented both sides, 57 vias
v3: diameter 1.5, hole 0.8, Top Layer to Bottom Layer, tented both sides, 7 vias

## Nets (pads, with @x,y where several pads share a name; then routed paths per layer and width w, separated by ;. In a path a pad name is that pad's centre, name@x,y a point inside that pad or via, vN(x,y) a via of type N, cw(c..) or ccw(c..) an arc to the next point about the centre after c; other vN are vias at no path point)
!_BA: U2.5 U3.3 | length 40.8
  Bottom Layer w0.4: U3.3@95.25,52.07 95.25,53.176 95.484,53.41 96.197,53.41 96.9,54.113 96.9,57.403 97.685,58.188 97.685,88.185 95.7,90.17 U2.5@95.25,90.17
"!_DOT Clk": U2.3 U3.7 | length 24.9
  Bottom Layer w0.4: U3.7@95.25,62.23 95.7,62.23 97.085,63.615 97.085,71.063 97.028,71.12 97.028,83.762 95.7,85.09 U2.3@95.25,85.09
!_Phi2: U2.13 U3.9 U4.11 U6.2 U6.3 | length 63.8
  Top Layer w0.4: U6.3@63.5,85.09 U6.2@63.5,82.55 63.95,82.55 71.12,75.38 U4.11@71.12,69.85 75.559,69.85 77.718,72.009 78.559,72.009 78.639,72.089 v1(79.709,72.089) ; U3.9@87.63,64.77 87.505,64.77 83.588,68.687 83.588,78.958 87.18,82.55 U2.13@87.63,82.55
  Bottom Layer w0.4: v1(79.709,72.089) 85.818,72.089 87.63,70.277 U3.9@87.63,64.77
!_R/W\: U2.11 U3.5 | length 39
  Top Layer w0.4: U2.11@87.63,87.63 87.18,87.63 82.988,83.438 82.988,68.161 83.391,67.758 83.391,66.862 86.683,63.57 88.437,63.57 94.857,57.15 U3.5@95.25,57.15
A0: CN1.Y U11.18 U12.2 | length 72.1
  Bottom Layer w0.4: U11.18@36.83,52.07 U12.2@33.02,52.07 34.22,50.87 34.22,44.201 30.489,40.47 30.489,28.721 30.45,28.682 30.45,27.606 30.489,27.567 30.489,23.446 33.361,20.574 49.784,20.574 53.34,17.018 53.34,5.211 CN1.Y@53.129,5
A1: CN1.X U11.17 U12.3 | length 71.8
  Bottom Layer w0.4: U11.17@36.83,54.61 U12.3@33.02,54.61 31.588,53.178 31.588,42.418 29.889,40.719 29.889,28.97 29.85,28.931 29.85,27.357 29.889,27.318 29.889,23.197 33.112,19.974 47.59,19.974 50.546,17.018 50.546,5.043 CN1.X@50.589,5
A2: CN1.W U11.16 U12.4 | length 72.6
  Bottom Layer w0.4: U11.16@36.83,57.15 U12.4@33.02,57.15 33.02,57.133 30.988,55.101 30.988,42.666 29.289,40.967 29.289,29.219 29.25,29.18 29.25,27.108 29.289,27.069 29.289,22.948 32.863,19.374 45.396,19.374 48.006,16.764 48.006,5.043 CN1.W@48.049,5
A3: CN1.V U11.15 U12.5 | length 73.9
  Bottom Layer w0.4: U12.5@33.02,59.69 U12.5@33.62,59.69 ; U11.15@36.83,59.69 U12.5@33.62,59.69 ; CN1.V@45.509,5 45.466,5.043 45.466,16.764 43.456,18.774 32.615,18.774 28.689,22.7 28.689,26.821 28.65,26.86 28.65,29.428 28.689,29.467 28.689,41.216 30.388,42.915 30.388,55.35 31.82,56.782 31.82,57.647 33.62,59.447 U12.5@33.62,59.69
A4: CN1.U U11.14 U12.6 | length 75.1
  Bottom Layer w0.4: U12.6@33.02,62.23 U12.6@33.62,62.23 ; U11.14@36.83,62.23 U12.6@33.62,62.23 ; CN1.U@42.969,5 43.18,5.211 43.18,16.51 41.516,18.174 32.366,18.174 28.089,22.451 28.089,26.572 28.05,26.611 28.05,29.677 28.089,29.716 28.089,41.464 29.788,43.163 29.788,55.599 31.22,57.031 31.22,59.09 31.82,59.69 31.82,60.187 32.559,60.926 33.62,61.987 U12.6@33.62,62.23
A5: CN1.T U11.13 U12.7 | length 75.2
  Bottom Layer w0.4: U11.13@36.83,64.77 U12.7@33.02,64.77 31.82,63.57 31.82,61.036 30.62,59.836 30.62,57.279 29.188,55.847 29.188,43.412 27.489,41.713 27.489,29.964 27.45,29.925 27.45,26.363 27.489,26.324 27.489,22.203 32.166,17.526 38.862,17.526 40.386,16.002 40.386,5.043 CN1.T@40.429,5
A6: CN1.S U11.12 U12.8 | length 76.4
  Bottom Layer w0.4: U11.12@36.83,67.31 U12.8@33.02,67.31 33.02,66.985 32.315,66.28 32.315,65.762 31.22,64.667 31.22,61.284 30.02,60.084 30.02,57.647 28.588,56.215 28.588,43.661 26.889,41.962 26.889,30.213 26.85,30.174 26.85,26.114 26.889,26.075 26.889,21.954 31.917,16.926 36.922,16.926 38.1,15.748 38.1,5.211 CN1.S@37.889,5
A7: CN1.R U11.11 U12.9 | length 76.4
  Bottom Layer w0.4: CN1.R@35.349,5 35.349,14.689 33.712,16.326 31.669,16.326 26.289,21.706 26.289,25.827 26.25,25.866 26.25,30.422 26.289,30.461 26.289,42.21 27.988,43.909 27.988,56.464 29.42,57.896 29.42,60.333 30.62,61.533 30.62,64.916 31.715,66.011 31.715,68.545 U12.9@33.02,69.85 U11.11@36.83,69.85
A8: CN1.P U14.18 U15.2 | length 63.2
  Bottom Layer w0.4: U14.18@17.78,52.07 U15.2@13.97,52.07 15.17,50.87 15.17,48.564 14.936,48.33 14.64,48.33 13.3,46.99 13.3,35.595 13.335,35.56 13.335,29.648 15.875,27.108 15.875,23.72 24.99,14.605 29.845,14.605 32.809,11.641 CN1.P@32.809,5
A9: CN1.N U14.17 U15.3 | length 62.7
  Bottom Layer w0.4: U14.17@17.78,54.61 U15.3@13.97,54.61 12.7,53.34 12.7,29.435 15.275,26.86 15.275,23.471 24.741,14.005 27.27,14.005 30.269,11.006 CN1.N@30.269,5
A10: CN1.M U14.16 U15.4 | length 64.5
  Bottom Layer w0.4: U14.16@17.78,57.15 U15.4@13.97,57.15 12.065,55.245 12.065,29.221 14.675,26.611 14.675,23.223 24.493,13.405 26.6,13.405 27.729,12.276 CN1.M@27.729,5
A11: CN1.L U14.15 U15.5 | length 65.3
  Bottom Layer w0.4: U14.15@17.78,59.69 U15.5@13.97,59.69 11.43,57.15 11.43,29.008 14.075,26.363 14.075,22.974 25.189,11.86 CN1.L@25.189,5
A12: CN1.K U14.14 U15.6 | length 67.2
  Bottom Layer w0.4: U14.14@17.78,62.23 U15.6@13.97,62.23 10.83,59.09 10.83,28.759 13.475,26.114 13.475,22.726 22.649,13.552 CN1.K@22.649,5
A13: CN1.J U14.13 U15.7 | length 69.3
  Bottom Layer w0.4: U14.13@17.78,64.77 U15.7@13.97,64.77 10.16,60.96 10.16,28.581 12.875,25.866 12.875,22.477 20.109,15.243 CN1.J@20.109,5
A14: CN1.H U14.12 U15.8 | length 71.3
  Bottom Layer w0.4: CN1.H@17.569,5 17.569,16.935 12.275,22.229 12.275,25.617 9.56,28.332 9.56,62.9 U15.8@13.97,67.31 U14.12@17.78,67.31
A15: CN1.F U14.11 U15.9 | length 73.3
  Bottom Layer w0.4: CN1.F@15.029,5 15.029,18.626 11.675,21.98 11.675,25.369 8.89,28.154 8.89,64.77 U15.9@13.97,69.85 U14.11@17.78,69.85
ADDR_DIR_OE: R5.1 U3.15 U6.12 U9.12 U9.13 U11.19 U14.19 | length 180.3
  Top Layer w0.4: U14.19@17.78,49.53 18.23,49.53 19.43,48.33 28.194,48.33 30.734,50.87 35.04,50.87 36.38,49.53 U11.19@36.83,49.53 40.669,49.53 41.869,48.33 v1(46.228,48.33) 49.496,48.33 52.036,45.79 56.827,45.79 56.977,45.94 61.934,45.94 62.084,45.79 62.168,45.79 63.337,44.621 73.526,44.621 74.785,45.88 77.234,45.88 77.324,45.79 81.233,45.79 82.193,44.83 84.582,44.83 85.725,45.973 85.725,48.075 87.18,49.53 U3.15@87.63,49.53 ; U9.12@36.83,113.03 41.177,113.03 42.447,114.3 v1(46.101,114.3)
  Bottom Layer w0.4: R5.1@33.655,123.19 33.655,115.755 36.38,113.03 U9.12@36.83,113.03 U9.13@36.83,110.49 ; v1(46.101,114.3) 46.228,114.173 46.228,79.502 ; v1(46.228,48.33) 46.228,79.502 ; U6.12@55.88,85.09 51.816,85.09 46.228,79.502
B\U\S\A\C\K\: U6.1 U13.23 | length 85.1
  Top Layer w0.4: U13.23@10.16,118.11 10.61,118.11 16.96,111.76 28.007,111.76 28.037,111.73 v1@48.768,111.73 ; v1(48.7,90.678) 51.689,90.678 52.578,89.789 52.578,83.705 54.933,81.35 54.978,81.35 55.118,81.21 58.184,81.21 59.384,80.01 U6.1@63.5,80.01
  Bottom Layer w0.4: v1(48.7,90.678) 48.734,90.712 48.734,111.726 v1(48.768,111.76)
B\U\S\R\Q\: U9.6 U13.25 | length 37.5
  Top Layer w0.4: v1(20.193,119.507) 20.25,119.45 42.8,119.45 44,120.65 U9.6@44.45,120.65
  Bottom Layer w0.4: U13.25@10.16,113.03 12.301,113.03 15.488,116.217 16.903,116.217 v1(20.193,119.507)
BA: CN1.12 FB2.1 | length 102.3
  Top Layer w0.4: CN1.12@30.269,5 30.269,20.871 43.307,33.909 54.017,33.909 54.086,33.839 54.299,33.839 v1(54.356,33.782)
  Bottom Layer w0.4: v1(54.356,33.782) 56.769,36.195 56.769,38.481 58.144,39.856 99.292,39.856 101.6,42.164 FB2.1@101.6,46.99
CLK: Q1.1 U2.8 U5.3 U13.6 | length 97.6
  Top Layer w0.4: v1(33.655,109.093) 33.712,109.15 65.965,109.15 67.056,110.241 67.056,112.522 66.548,113.03 U5.3@63.5,113.03
  Bottom Layer w0.4: U13.6@25.4,87.63 25.85,87.63 27.05,88.83 27.05,93.981 26.963,94.068 26.963,94.4 33.655,101.092 v1(33.655,109.093) ; U5.3@63.5,113.03 67.677,113.03 76.567,104.14 Q1.1@80.01,104.14 80.01,102.42 87.18,95.25 U2.8@87.63,95.25
D0: CN1.21 U4.3 U5.12 U7.18 U8.2 | length 148.8
  Top Layer w0.4: v1(49.657,112.903) 49.784,113.03 U5.12@55.88,113.03 ; v1(49.749,89.789) 49.749,54.391 U8.2@52.07,52.07 U7.18@55.88,52.07 60.066,52.07 61.266,50.87 65.786,50.87 68.326,48.33 74.55,48.33 78.29,52.07 U4.3@78.74,52.07 ; CN1.21@53.129,5 53.171,5.042 53.171,21.548 v1(53.213,21.59)
  Bottom Layer w0.4: v1(49.657,112.903) 49.703,112.857 49.703,89.835 v1(49.749,89.789) ; U8.2@52.07,52.07 53.27,50.87 53.27,47.255 49.276,43.261 49.276,25.527 v1(53.213,21.59)